# Altium PCB SSB23_rev0.PcbDoc (part 3 of 3)
Units mil, origin at the board's own origin, x right, y up, seen from the top; angles counter-clockwise.
Board outline 4555 x 3775 mil, 2 copper layers (Top Layer, Bottom Layer); 91 components, 73 nets, 352 pads, 879 vias.
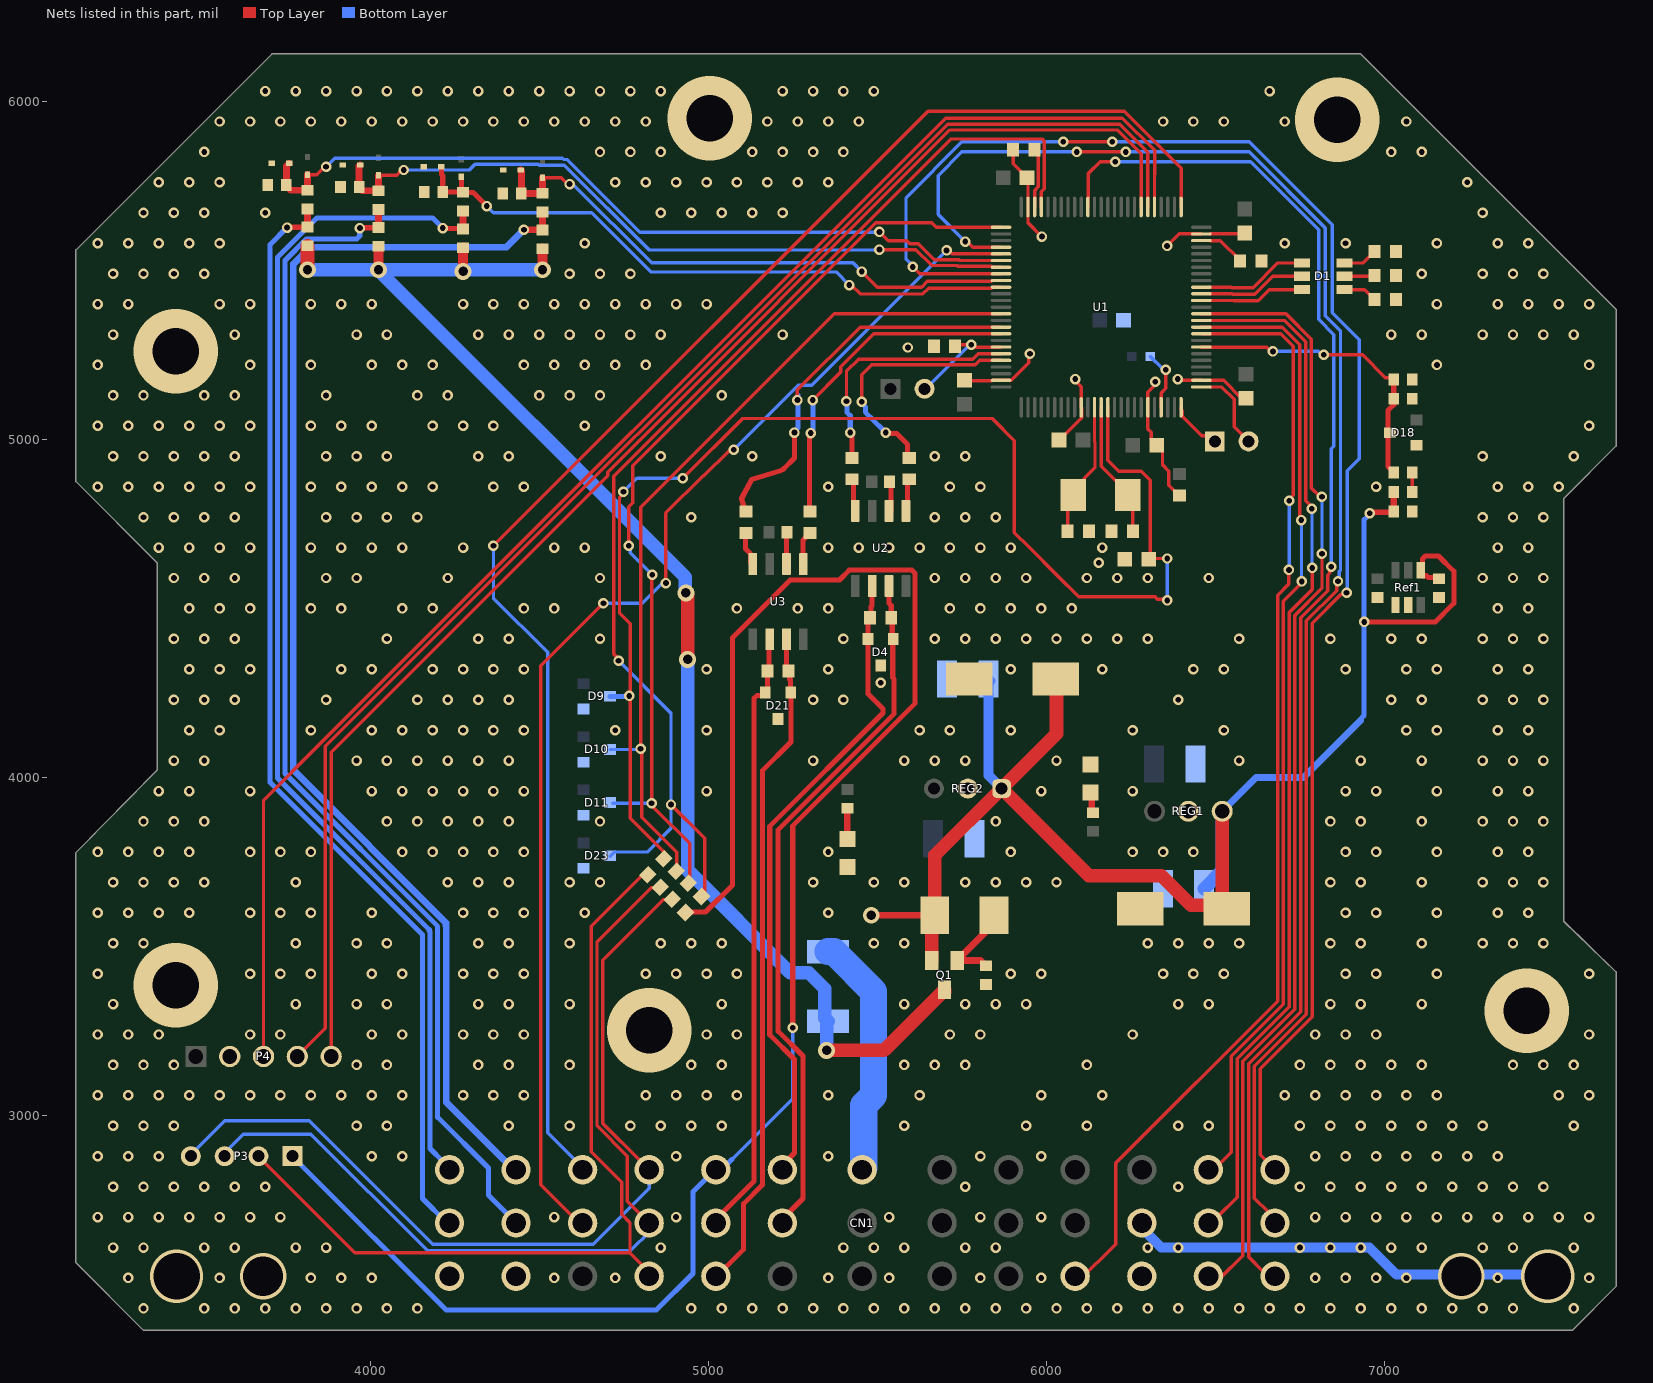
[diagram p2: the nets of this part, all layers, seen from the top]

## Via types
v1: diameter 31, hole 17, Top Layer to Bottom Layer, 854 vias
v2: diameter 50, hole 28, Top Layer to Bottom Layer, 12 vias
v3: diameter 250, hole 137, Top Layer to Bottom Layer, 7 vias
v4: diameter 157.48, hole 137.8, Top Layer to Bottom Layer, 2 vias
v5: diameter 137.8, hole 118.11, Top Layer to Bottom Layer, 2 vias
v6: diameter 59.06, hole 39.37, Top Layer to Bottom Layer, 2 vias

## Nets (pads, with @x,y where several pads share a name; then routed paths per layer and width w, separated by ;. In a path a pad name is that pad's centre, name@x,y a point inside that pad or via, vN(x,y) a via of type N, cw(c..) or ccw(c..) an arc to the next point about the centre after c; other vN are vias at no path point) (continued)
ADC123_IN15: CN1.12 U1.34 | length 3306.2
  Top Layer w10: CN1.12@6095,2510 6205,2620 6205,2860 6684,3339 6684,4539 6717.23,4572.23 v1(6717.23,4613.74) ; U1.34@6460.5,5312 6693,5312 6730,5275 6730,4834.86 v1@6718.5,4823.37
  Bottom Layer w10: v1@6717.87,4614.38 v1@6717.87,4817.87
  other v1: 6718.5,4818.5
BOOT0: P1.2 R4.1 U1.94 | length 348.9
  Top Layer w10: P1.2@5639.76,5149.61 P1.2@5653.57,5163.42 ; R4.1@5730.31,5275.59 5734.25,5279.53 v1(5777.56,5279.53) ; v1@5777.56,5271.65 5783.4,5271.65 5784.62,5272.87 U1.94@5865.98,5272.87
  Bottom Layer w10: P1.2@5639.76,5149.61 5643.7,5149.61 5773.62,5279.53 v1(5777.56,5279.53)
"CAN Rx": R9.2 U1.95 | length 734.5
  Top Layer w10: v1(5408.86,5112.79) 5408.86,5201.22 5445.08,5237.44 5782.27,5237.44 5798.02,5253.19 U1.95@5865.98,5253.19
  Top Layer w15: R9.2@5425,4945 v1@5425,5015
  Bottom Layer w15: v1(5408.86,5112.79) 5410,5111.64 5410,5080 5420,5070 v1(5420,5020)
"CAN Tx": R10.2 U1.96 | length 751.7
  Top Layer w10: v1(5453.86,5111.22) 5453.86,5191.22 5483.08,5220.44 5789.31,5220.44 5802.38,5233.5 U1.96@5865.98,5233.5
  Top Layer w15: v1(5525,5020) 5528.06,5016.94 5558.06,5016.94 5590,4985 5590,4949.63 R10.2@5594.63,4945
  Bottom Layer w15: v1(5453.86,5111.22) 5453.86,5106.89 5464.69,5096.06 5464.69,5080.31 5480.83,5064.17 v1(5525,5020)
CAN_N: CN1.22 D4.2 R11.1 U2.6 | length 1933.6
  Top Layer w15: CN1.22@5219.25,2840 5219.25,2853.85 5255,2889.59 5255,3165.98 5182,3238.98 5182,3855.59 5516.99,4190.58 5516.99,4203.01 5472.41,4247.59 D4.2@5472.41,4409.4 5472.41,4466.65 R11.1@5478.32,4472.56 5481.95,4476.19 5481.95,4505.96 5484.81,4508.82 U2.6@5484.81,4566.23
CAN_P: CN1.23 D4.1 R11.2 U2.7 | length 2061.7
  Top Layer w15: CN1.23@5230,2705 5280,2755 5280,3176.33 5207,3249.33 5207,3845.23 5550,4188.23 5550,4291.62 5545.82,4295.8 5545.82,4408.01 D4.1@5547.21,4409.4 5544.26,4412.35 5544.26,4469.61 R11.2@5541.31,4472.56 5541.31,4508.69 5534.81,4515.19 U2.7@5534.81,4566.23
"Debug LED B": D1.6 U1.39 | length 286.3
  Top Layer w10: U1.39@6484.01,5410.67 6554.35,5410.67 6555.57,5409.45 6625.98,5409.45 6659.45,5442.91 D1.6@6755.91,5442.91
"Debug LED G": D1.5 U1.40 | length 294.4
  Top Layer w10: U1.40@6484.01,5430.35 6549.27,5430.35 6550.49,5429.13 6615.82,5429.13 6668.97,5482.28 D1.5@6755.91,5482.28
"Debug LED R": D1.4 U1.41 | length 302.6
  Top Layer w10: U1.41@6484.01,5450.04 6547.09,5450.04 6548.31,5448.82 6611.46,5448.82 6684.29,5521.65 D1.4@6755.91,5521.65
FL_WHEEL_S_µC: C44.2 D31.2 D32.1 R79.2 U1.85 | length 1900.4
  Top Layer w10: v1(5417.38,5456.22) 5423.06,5456.22 5449.28,5430 5634.9,5430 5652.17,5447.28 5837.79,5447.28 5840.55,5450.04 U1.85@5865.98,5450.04
  Top Layer w15: D32.1@4210.98,5806.56 4210.98,5784.02 4215,5780 C44.2@4215,5731.56 R79.2@4273.97,5731.56 ; R79.2@4270,5735.53 D31.2@4270,5776.56 ; R79.2@4275,5730.53 4304.47,5730.53 v1(4345,5690)
  Bottom Layer w10: v1(4345,5690) 4365,5670 4655,5670 4830,5495 5378.52,5495 5417.3,5456.22 v1(5417.38,5456.22)
FR_WHEEL_S_µC: C43.2 D29.2 D30.1 R77.2 U1.84 | length 1667.7
  Top Layer w10: D29.2@4510,5773.59 4565.72,5773.59 4584.32,5755 v1(4590,5755) ; v1(5453.86,5496.22) 5500.08,5450 5630.86,5450 5647.9,5467.04 5837.86,5467.04 5840.55,5469.72 U1.84@5865.98,5469.72
  Top Layer w20: D30.1@4445.98,5796.56 4447.56,5794.99 C43.2@4447.56,5726.56 4448.06,5727.06 4509.5,5727.06 R77.2@4510,5727.56 D29.2@4510,5773.59
  Bottom Layer w10: v1@4600,5755 4833.18,5521.82 5428.18,5521.82 5453.78,5496.22 v1(5453.86,5496.22)
"GLV Power In": CN1.19 F8.1 | length 717.9
  Bottom Layer w80: F8.1@5354.33,3484.84 F8.1@5371.38,3484.84 ; F8.1@5376.34,3479.88 5489.48,3366.74 5489.48,3060.22 5460,3030.75 5460,2846.32 5455.47,2841.79 CN1.19@5455.47,2840
GND: C1.1 C2.1 C3.1 C4.1 C5.1 C6.1 C7.1 C8.1 C9.1 C10.1 C11.1 C12.2 C13.1 C14.1 C15.1 C16.2 C17.1 C18.1 C19.1 C22.1 C23.1 C24.1 C25.1 C33.1 C41.1 C42.1 C43.1 C44.1 CN1.8 CN1.9 CN1.36 CN1.39 D4.3 D9.1 D10.1 D11.1 D18.1 D21.3 D23.1 D26.2 D28.2 D30.2 D32.2 DS1.2 DS2.2 P4.2 R1.2 R2.2 R3.2 R4.2 R5.1 R45.1 R46.1 Ref1.1 Ref1.2 REG1.2 REG2.2 U1.10 U1.20 U1.27 U1.49 U1.74 U1.99 U2.2 U3.2 | length 3013.1
  Top Layer w10: C9.1@5757.87,5175.2 5759.84,5173.23 5839.33,5173.23 5840.55,5174.45 U1.99@5865.98,5174.45 ; U1.99@5866.06,5174.53 5895.9,5174.53 5947.6,5226.23 5947.6,5249.17 v1(5951.61,5253.19) ; C2.1@5901.57,5856.63 5901.57,5815.13 C25.1@5942.91,5773.79 5946.85,5769.85 5945.71,5768.71 5945.71,5640.98 v1(5987.05,5599.65) ; C6.1@6037.4,4998.03 6038.69,4998.03 6104.25,5063.59 U1.10@6104.25,5093.43 ; v1(6085.47,5178.39) 6085.47,5172.7 6103.19,5154.99 U1.10@6103.19,5094.72 ; v1(6321.69,5170.51) 6321.69,5160.89 6300.12,5139.32 U1.20@6300.12,5094.8 ; v1(6357.12,5572.09) 6392.56,5607.52 U1.49@6458.5,5607.52 ; v1(6388.62,5178.39) 6392.48,5174.53 6458.42,5174.53 U1.27@6458.5,5174.45 ; C3.1@6393.7,4834.65 6391.73,4834.65 6362.02,4864.36 6362.02,4905.7 6343.43,4924.29 6343.43,4965.63 C7.1@6326.77,4982.28 6310.12,4998.94 6310.12,5020.59 6300.04,5030.67 U1.20@6300.04,5094.72 ; U1.27@6484.01,5174.45 6524.37,5174.45 6576.77,5122.05 C8.1@6590.55,5122.05 ; U1.49@6484.01,5607.52 6581.29,5607.52 6582.51,5606.3 C23.1@6586.61,5610.4 ; U1.20@6300.04,5094.72 U1.20@6300.12,5094.8 ; U1.20@6300.04,5094.72 U1.20@6300.12,5094.8
  Top Layer w15: U3.2@5230.34,4630.31 5231.92,4631.88 C24.1@5231.92,4723.98 ; U2.2@5540,4785.78 C19.1@5540,4870
  Bottom Layer w30: CN1.8@6282.24,2682.52 6282.24,2667.51 6339.76,2610 6955,2610 7035,2530 v5@7227.13,2530 ; v5(7227.13,2525.04) 7232.09,2530 v4@7488.09,2530
  other v1: 3330,2430 3510,2430 3600,2430 3690,2430 3780,2430 3870,2430 3960,2430 4050,2430 4140,2430 4950,2430 5040,2430 5130,2430 5220,2430 5310,2430 5400,2430 5490,2430 5580,2430 5670,2430 5760,2430 5850,2430 5940,2430 6030,2430 6120,2430 6210,2430 6300,2430 6390,2430 6480,2430 6570,2430 6660,2430 6750,2430 6840,2430 6930,2430 7020,2430 7110,2430 7200,2430 7290,2430 7380,2430 7560,2430 3285,2520 3555,2520 3825,2520 3915,2520 4005,2520 4545,2520 4725,2520 5355,2520 5535,2520 5805,2520 5985,2520 6795,2520 6885,2520 6975,2520 7065,2520 7335,2520 7605,2520 3240,2610 3330,2610 3510,2610 3600,2610 3780,2610 3870,2610 4860,2610 5400,2610 5490,2610 5580,2610 5760,2610 5850,2610 6300,2610 6390,2610 6750,2610 6840,2610 6930,2610 7020,2610 7110,2610 7290,2610 7380,2610 7560,2610 3195,2700 3285,2700 3375,2700 3465,2700 3555,2700 3645,2700 3735,2700 4545,2700 4905,2700 5535,2700 5805,2700 5985,2700 6795,2700 6885,2700 6975,2700 7065,2700 7155,2700 7245,2700 7335,2700 7425,2700 7515,2700 7605,2700 3240,2790 3330,2790 3420,2790 3510,2790 3600,2790 3690,2790 5760,2790 6390,2790 6750,2790 6840,2790 6930,2790 7020,2790 7110,2790 7200,2790 7290,2790 7380,2790 7470,2790 3195,2880 3285,2880 3375,2880 4005,2880 4095,2880 4905,2880 5355,2880 5805,2880 5985,2880 6795,2880 6885,2880 6975,2880 7065,2880 7155,2880 7245,2880 7335,2880 3240,2970 3330,2970 3420,2970 3960,2970 4050,2970 4410,2970 4590,2970 4770,2970 4860,2970 4950,2970 5040,2970 5580,2970 5940,2970 6120,2970 6390,2970 6480,2970 6750,2970 6840,2970 6930,2970 7020,2970 7110,2970 7200,2970 7290,2970 7560,2970 3195,3060 3285,3060 3375,3060 3465,3060 3555,3060 3645,3060 3735,3060 3825,3060 3915,3060 4005,3060 4095,3060 4275,3060 4365,3060 4455,3060 4815,3060 4905,3060 4995,3060 5085,3060 5355,3060 5625,3060 5985,3060 6165,3060 6705,3060 6795,3060 6885,3060 6975,3060 7065,3060 7155,3060 7515,3060 7605,3060 3240,3150 3330,3150 3420,3150 3960,3150 4050,3150 4320,3150 4410,3150 4590,3150 4950,3150 5040,3150 5580,3150 5670,3150 5760,3150 6120,3150 6750,3150 6840,3150 6930,3150 7020,3150 7110,3150 7380,3150 7470,3150 7560,3150 3195,3240 3285,3240 3375,3240 3645,3240 3735,3240 4005,3240 4095,3240 4275,3240 4365,3240 4455,3240 4995,3240 5085,3240 5715,3240 5805,3240 6255,3240 6795,3240 6885,3240 6975,3240 7605,3240 3240,3330 3780,3330 3960,3330 4050,3330 4320,3330 4410,3330 4590,3330 5040,3330 5580,3330 5760,3330 5850,3330 5940,3330 6390,3330 6480,3330 6840,3330 6930,3330 7110,3330 3195,3420 3645,3420 3735,3420 3825,3420 4005,3420 4095,3420 4275,3420 4365,3420 4455,3420 4815,3420 4905,3420 4995,3420 5085,3420 5895,3420 5985,3420 6345,3420 6435,3420 6525,3420 6885,3420 6975,3420 7155,3420 7605,3420 3240,3510 3330,3510 3780,3510 3960,3510 4050,3510 4320,3510 4410,3510 4590,3510 4860,3510 4950,3510 5040,3510 5490,3510 5580,3510 6300,3510 6390,3510 6480,3510 6570,3510 6840,3510 6930,3510 7110,3510 7290,3510 7380,3510 7470,3510 3195,3600 3285,3600 3375,3600 3465,3600 3645,3600 3735,3600 3825,3600 4005,3600 4275,3600 4365,3600 4455,3600 4635,3600 5355,3600 6885,3600 6975,3600 7155,3600 7335,3600 7425,3600 3240,3690 3330,3690 3420,3690 3510,3690 3780,3690 4230,3690 4320,3690 4410,3690 4590,3690 4680,3690 5310,3690 5490,3690 5580,3690 5760,3690 5850,3690 5940,3690 6030,3690 6840,3690 6930,3690 7110,3690 7290,3690 7380,3690 7470,3690 3195,3780 3285,3780 3375,3780 3465,3780 3645,3780 3735,3780 3825,3780 4095,3780 4185,3780 4275,3780 4365,3780 4455,3780 5355,3780 5895,3780 6255,3780 6345,3780 6435,3780 6885,3780 6975,3780 7155,3780 7335,3780 7425,3780 3330,3870 3420,3870 3510,3870 4050,3870 4140,3870 4230,3870 4320,3870 4410,3870 4680,3870 5850,3870 6840,3870 6930,3870 7110,3870 7290,3870 7380,3870 7470,3870 3375,3960 3465,3960 3645,3960 4005,3960 4095,3960 4185,3960 4275,3960 4365,3960 4455,3960 4995,3960 5985,3960 6255,3960 6885,3960 6975,3960 7155,3960 7335,3960 7425,3960 3420,4050 3510,4050 3960,4050 4050,4050 4140,4050 4230,4050 4320,4050 4410,4050 5310,4050 5580,4050 5670,4050 5760,4050 6030,4050 6570,4050 6930,4050 7110,4050 7290,4050 7380,4050 7470,4050 3465,4140 3555,4140 3825,4140 4005,4140 4095,4140 4185,4140 4275,4140 4365,4140 4455,4140 4725,4140 4995,4140 5625,4140 5715,4140 5895,4140 6255,4140 6525,4140 7065,4140 7155,4140 7335,4140 7425,4140 3420,4230 3510,4230 3600,4230 3870,4230 4140,4230 4230,4230 4320,4230 4410,4230 5310,4230 5400,4230 6390,4230 7020,4230 7110,4230 7290,4230 7380,4230 7470,4230 5510,4280 3465,4320 3555,4320 3645,4320 3915,4320 4005,4320 4185,4320 4275,4320 4365,4320 4455,4320 4995,4320 5355,4320 5895,4320 6165,4320 6435,4320 6525,4320 6885,4320 7065,4320 7155,4320 7335,4320 7425,4320 3420,4410 3510,4410 3600,4410 4050,4410 4320,4410 4410,4410 4680,4410 5400,4410 5670,4410 5760,4410 5850,4410 5940,4410 6030,4410 6120,4410 6210,4410 6300,4410 6570,4410 6840,4410 7020,4410 7110,4410 7290,4410 7380,4410 7470,4410 3465,4500 3555,4500 3645,4500 3825,4500 3915,4500 4095,4500 4185,4500 4455,4500 4545,4500 5085,4500 5265,4500 5355,4500 5715,4500 5805,4500 5895,4500 5985,4500 6075,4500 7335,4500 7425,4500 3420,4590 3510,4590 3600,4590 3870,4590 3960,4590 4230,4590 4680,4590 5670,4590 5760,4590 5850,4590 5940,4590 6120,4590 6210,4590 6300,4590 6480,4590 7290,4590 7380,4590 7470,4590 6155,4635 3375,4680 3465,4680 3555,4680 3645,4680 3825,4680 3915,4680 4005,4680 4095,4680 4275,4680 4545,4680 4635,4680 5355,4680 5445,4680 5535,4680 5625,4680 5715,4680 5805,4680 5895,4680 6165,4680 7335,4680 7425,4680 3330,4770 3420,4770 3510,4770 3600,4770 3870,4770 3960,4770 4050,4770 4140,4770 4950,4770 5670,4770 5760,4770 5850,4770 7290,4770 7380,4770 7470,4770 3195,4860 3285,4860 3375,4860 3465,4860 3555,4860 3645,4860 3825,4860 3915,4860 4005,4860 4095,4860 4185,4860 4365,4860 4455,4860 5355,4860 5715,4860 5805,4860 6975,4860 7335,4860 7425,4860 7515,4860 3240,4950 3330,4950 3420,4950 3510,4950 3600,4950 3870,4950 3960,4950 4050,4950 4320,4950 4410,4950 4860,4950 5130,4950 5670,4950 5760,4950 7290,4950 7560,4950 3195,5040 3285,5040 3375,5040 3465,5040 3555,5040 3645,5040 3825,5040 3915,5040 4005,5040 4185,5040 4275,5040 4365,5040 4635,5040 7605,5040 3240,5130 3330,5130 3510,5130 3600,5130 3870,5130 4140,5130 4230,5130 4500,5130 4590,5130 4680,5130 5040,5130 3195,5220 3645,5220 3825,5220 4005,5220 4095,5220 4185,5220 4455,5220 4545,5220 4635,5220 4725,5220 4815,5220 7155,5220 7605,5220 5590.55,5271.65 3240,5310 3600,5310 3960,5310 4050,5310 4320,5310 4410,5310 4500,5310 4590,5310 4680,5310 4770,5310 4860,5310 5220,5310 7020,5310 7110,5310 7290,5310 7380,5310 7470,5310 7560,5310 3195,5400 3285,5400 3555,5400 3645,5400 3825,5400 3915,5400 4005,5400 4275,5400 4365,5400 4455,5400 4545,5400 4635,5400 4725,5400 4815,5400 4905,5400 4995,5400 7155,5400 7335,5400 7425,5400 7515,5400 7605,5400 3240,5490 3330,5490 3420,5490 3510,5490 4590,5490 4680,5490 4770,5490 7110,5490 7290,5490 7380,5490 7470,5490 3195,5580 3285,5580 3375,5580 3465,5580 3555,5580 4635,5580 6705,5580 6885,5580 7155,5580 7335,5580 7425,5580 3330,5670 3420,5670 3510,5670 3690,5670 4860,5670 4950,5670 5040,5670 5130,5670 5220,5670 7290,5670 3375,5760 3465,5760 3555,5760 4725,5760 4815,5760 4905,5760 4995,5760 5085,5760 5175,5760 5265,5760 5355,5760 7245,5760 3510,5850 4680,5850 4770,5850 4860,5850 5130,5850 5220,5850 5310,5850 5400,5850 7020,5850 7110,5850 3555,5940 3645,5940 3735,5940 3825,5940 3915,5940 4005,5940 4095,5940 4185,5940 4275,5940 4365,5940 4455,5940 4545,5940 4635,5940 4725,5940 4815,5940 5175,5940 5265,5940 5355,5940 5445,5940 6345,5940 6435,5940 6525,5940 6705,5940 7065,5940 3690,6030 3780,6030 3870,6030 3960,6030 4050,6030 4140,6030 4230,6030 4320,6030 4410,6030 4500,6030 4590,6030 4680,6030 4770,6030 4860,6030 5220,6030 5310,6030 5400,6030 5490,6030 6660,6030
  other v3: 4825.2,3252.83 7420,3310 3425.2,3385.83 3425.2,5260.87 6860,5945 5005,5950
  other v4: 3427.91,2525.04 7483.03,2525.04
  other v5: 3683.82,2525.04
I2C2_SDA: CN1.32 U1.80 | length 3693.3
  Top Layer w10: CN1.32@4610,2690 4505,2795 4505,4330 v1(4690,4515) ; v1(4875,4575) 4875,4782.33 4984.67,4892 4987,4892 5060.28,4965.28 5071.68,4965.28 v1(5075.7,4969.3) ; v1(5705,5558.72) 5710.68,5558.72 5720.94,5548.46 U1.80@5865.98,5548.46
  Bottom Layer w10: v1(4690,4515) 4805,4515 4875,4585 v1(4875,4575) ; v1(5075.7,4969.3) 5266.4,5160 5306.28,5160 v1(5705,5558.72)
I2C2_SMBA: CN1.31 U1.51 | length 4664.2
  Top Layer w10: v1(4365,4685) 5650,5970 6230,5970 6398.46,5801.54 U1.51@6398.46,5687.24
  Bottom Layer w10: v1(4365,4685) 4365,4530 4525,4370 4525,3325 4525,2950 CN1.31@4605,2870
"LORA Reset": P4.5 U1.57 | length 4250.9
  Top Layer w10: P4.5@3885,3174.04 3885,4075 4703,4893 4703,4903 5715,5915 6210,5915 6280.35,5844.65 U1.57@6280.35,5687.24
NetCN1_1: CN1.1 U1.83 | length 4886.8
  Top Layer w10: v1(5605,5510) 5625.59,5489.41 U1.83@5865.98,5489.41 ; v1(6050,5880) v1(6195,5880) ; CN1.1@6675.94,2840 6632,2883.94 6632,3138.94 6786,3292.94 6786,4456 6872.68,4542.68 6883.77,4542.68 v1(6887.79,4546.69)
  Bottom Layer w10: v1(5605,5510) 5605,5513.13 5585,5533.13 5585,5715 5750,5880 v1(6050,5880) ; v1(6195,5880) 6600,5880 6845,5635 6845,5375 6925,5295 6925,4942.29 6890,4907.29 6890,4548.91 v1(6887.79,4546.69)
NetCN1_2: CN1.2 U1.79 | length 4662.9
  Top Layer w10: v1(5760,5585) 5765.68,5585 5782.53,5568.15 U1.79@5865.98,5568.15 ; v1(6090,5850) v1(6235,5850) ; CN1.2@6657.06,2712.06 6657.06,2713.69 6615,2755.75 6615,3145.98 6769,3299.98 6769,4463.04 6858.48,4552.52 6858.48,4576.2 v1(6862.5,4580.21)
  Bottom Layer w10: v1(5760,5585) 5680,5665 5680,5780 5750,5850 v1(6090,5850) ; v1(6235,5850) 6600,5850 6825,5625 6825,5365 6870,5320 6870,4613.4 6866.52,4609.91 6866.52,4584.23 v1(6862.5,4580.21)
NetCN1_3: CN1.3 U1.65 | length 4098.8
  Top Layer w10: U1.65@6122.87,5687.24 6122.87,5712.68 6123.86,5713.66 6123.86,5786.22 6158.86,5821.22 v1(6203.86,5821.22) ; CN1.3@6640,2540 6598,2582 6598,3153.02 6600,3155.02 6741.04,3296.06 6752,3307.02 6752,4472 6832,4552 6832,4598.39 6838.48,4604.87 6838.48,4619.29 v1(6842.5,4623.31)
  Bottom Layer w10: v1(6203.86,5821.22) 6603.78,5821.22 6805,5620 6805,5355 6850,5310 6850,4979.3 6842.5,4971.8 v1(6842.5,4623.31)
NetCN1_4: CN1.4 U1.35 | length 2878.7
  Top Layer w10: U1.35@6458.5,5331.93 6458.57,5332 6698,5332 6749.86,5280.14 6749.86,4765.22 v1(6753.86,4761.22) ; CN1.4@6479.09,2840 6495,2840 6547,2892 6547,3175.08 6701,3329.08 6701,4521.4 6755,4575.4 v1(6755,4580)
  Bottom Layer w10: v1(6753.86,4761.22) 6754.43,4760.65 6754.43,4580.57 v1(6755,4580)
NetCN1_5: CN1.5 U1.36 | length 3049.7
  Top Layer w10: U1.36@6458.5,5351.61 6703.39,5351.61 6766.86,5288.14 6766.86,4818.83 6785,4800.68 v1(6785,4795) ; CN1.5@6503.15,2698.15 6564,2759 6564,3168.04 6718,3322.04 6718,4488 6785.98,4555.98 v1(6785.98,4619.7)
  Bottom Layer w10: v1(6785,4795) 6785.49,4794.51 6785.49,4620.19 v1(6785.98,4619.7)
NetCN1_6: CN1.6 U1.37 | length 3281.1
  Top Layer w10: U1.37@6458.5,5371.3 6708.7,5371.3 6783.86,5296.14 6783.86,4856.14 6810,4830 v1(6815,4830) ; CN1.6@6479.09,2525.04 CN1.6@6485,2530.95 ; CN1.6@6515,2520 6581,2586 6581,3161 6735,3315 6735,4479.04 6815,4559.04 v1(6815,4662.01)
  Bottom Layer w10: v1(6815,4662.01) v1(6815,4830)
NetD1_1: D1.1 R3.1 | length 100.8
  Top Layer w10: D1.1@6881.89,5442.91 6940.94,5442.91 R3.1@6970.47,5413.39
NetD1_2: D1.2 R2.1 | length 89.5
  Top Layer w10: D1.2@6881.89,5482.28 6968.34,5482.28 R2.1@6970.47,5484.42
NetD1_3: D1.3 R1.1 | length 102.6
  Top Layer w10: D1.3@6881.89,5521.65 6936.67,5521.65 R1.1@6970.47,5555.45
NetD2_A: D2.A Q1.1 R5.2 | length 270.4
  Top Layer w20: R5.2@5821.03,3442.91 5805.29,3458.66 Q1.1@5736.22,3458.66 5845.47,3567.91 D2.A@5845.47,3592.52
NetDS1_1: DS1.1 R6.2 | length 63.5
  Top Layer w20: DS1.1@6129.92,3955.88 6133.94,3951.86 6133.94,3899.69 R6.2@6137.96,3895.67
NetDS2_1: DS2.1 R7.2 | length 91.9
  Top Layer w20: DS2.1@5411.42,3817.55 R7.2@5411.42,3909.45
NetL1_2: L1.2 U1.22 | length 188.9
  Top Layer w10: U1.22@6339.41,5094.72 6339.41,5137.05 6353.19,5150.83 v1(6353.19,5205.94)
  Bottom Layer w10: L1.2@6307.56,5245 v1@6343.55,5209.01 ; v1@6347.16,5198.26 6353.19,5204.29 v1(6353.19,5205.94)
  Bottom Layer w15: v1@6343.55,5209.01 6350.13,5209.01 v1(6353.19,5205.94)
NetR9_1: R9.1 U2.4 | length 83.5
  Top Layer w15: U2.4@5430,4791.48 R9.1@5430,4875
NetR10_1: R10.1 U2.1 | length 83.5
  Top Layer w15: U2.1@5590,4786.48 R10.1@5590,4870
NetR28_1: R28.1 U3.4 | length 101.2
  Top Layer w15: R28.1@5110,4723.03 5110,4676.49 5125.05,4661.44 5125.05,4635.6 U3.4@5130.34,4630.31
NetR29_1: R29.1 U3.1 | length 81.4
  Top Layer w15: U3.1@5280,4650 5280,4702.01 5287.81,4709.82 5287.81,4711.79 5298.03,4722.01 R29.1@5300,4722.01
NetR43_2: R43.2 R44.1 | length 57.3
  Top Layer w10: R43.2@7082.56,4844.47 R44.1@7082.56,4901.72
NRST: C1.2 D9.3 F5.1 U1.14 | length 4002
  Top Layer w10: v1(4749.32,4845) 4749.32,4839.32 4737.5,4827.5 4737.5,4487.5 4770,4455 v1@4770,4241.25 ; v1@4766.31,4233.69 4767.43,4233.69 4769.57,4231.55 4769.57,3879.48 4870.1,3778.95 4870.1,3760.97 F5.1@4868.71,3759.57 ; v1(4925,4885) 5101.64,5061.64 5839.93,5061.64 5905.51,4996.06 5905.51,4724.41 5949.11,4680.81 6031.51,4598.41 6095.8,4534.12 6321.79,4534.12 6328.27,4527.64 6353.27,4527.64 v1(6357.29,4523.62) ; U1.14@6181.93,5094.72 6181.93,4938.15 6214.05,4906.03 6280.23,4906.03 6307.09,4879.18 6307.09,4649.44 C1.2@6305.29,4647.64 ; C1.2@6303.15,4645.5 C1.2@6305.29,4647.64 ; v1(6357.29,4647.64) C1.2@6305.29,4647.64
  Top Layer w15: v1@4766.31,4233.69 v1(4766.31,4241.25)
  Bottom Layer w10: v1(4749.32,4845) 4789.32,4885 v1(4925,4885) ; v1(6357.29,4523.62) v1(6357.29,4647.64)
  Bottom Layer w15: D9.3@4710,4240 4765.06,4240 v1(4766.31,4241.25)
"NRST F": CN1.30 F5.2 P3.2 | length 2545.6
  Top Layer w10: P3.2@3670,2880 3955,2595 4768.66,2595 ; CN1.30@4807.06,2555.87 4807.06,2556.6 4768.66,2595 ; CN1.30@4808.09,2556.91 CN1.30@4830,2535 ; F5.2@4821.38,3712.25 4806.13,3712.25 4654.2,3560.31 4654.2,2892.72 4743.98,2802.93 4743.98,2708.73 4768.66,2684.05 4768.66,2595
"Ph0 OSC In": C4.2 U1.12 X1.1 | length 400.4
  Top Layer w10: C4.2@6062.82,4728.35 6062.82,4826.6 6082.68,4846.46 6082.68,4854.33 6143.7,4915.35 6143.7,4991.75 6142.56,4992.89 U1.12@6142.56,5094.72
"Ph1 OSC Out": C10.2 U1.13 X1.2 | length 405.2
  Top Layer w10: U1.13@6162.24,5094.72 6162.24,4920.43 6236.22,4846.46 6255.91,4826.77 C10.2@6255.91,4728.35
RL_WHEEL_S_µC: C42.2 D27.2 D28.1 R75.2 U1.82 | length 2157.8
  Top Layer w10: D27.2@4025,5781.03 4078.79,5781.03 4094.32,5796.56 v1(4100,5796.56) ; v1(5506.36,5561.22) 5613.78,5561.22 5660.78,5514.22 5734.89,5514.22 5737.34,5511.78 5837.86,5511.78 5840.55,5509.09 U1.82@5865.98,5509.09
  Top Layer w20: D28.1@3970.98,5811.56 3967.56,5808.14 C42.2@3967.56,5746.56 3967.56,5744.6 3977.16,5735 R75.2@4025,5735 D27.2@4025,5781.03
  Bottom Layer w10: v1(4100,5796.56) 4292.84,5796.56 4310.34,5814.06 4497.5,5814.06 4500.86,5810.71 4574.29,5810.71 4825,5560 5505.14,5560 v1(5506.36,5561.22)
RR_WHEEL_S_µC: C41.2 D25.2 D26.1 R73.2 U1.81 | length 2381.9
  Top Layer w10: D25.2@3815,5783.02 3842.84,5783.02 3865.88,5806.06 v1(3870,5806.06) ; v1(5506.36,5613.28) 5531.8,5587.83 5587.17,5587.83 5596.78,5578.22 5620.82,5578.22 5667.82,5531.22 5741.94,5531.22 5744.38,5528.78 U1.81@5865.98,5528.78
  Top Layer w20: D26.1@3760.98,5816.56 3752.56,5808.14 C41.2@3752.56,5751.56 3752.56,5749.6 3765.59,5736.56 R73.2@3815,5736.56 D25.2@3815,5783.02
  Bottom Layer w10: v1(3870,5806.06) 3895,5831.06 4568.94,5831.06 4572.29,5827.71 4581.33,5827.71 4796.98,5612.06 5505.14,5612.06 v1(5506.36,5613.28)
"Sensor CAN Rx": R28.2 U1.91 | length 1151.3
  Top Layer w10: v1(5263.86,5116.22) 5263.86,5146.22 5449.57,5331.93 U1.91@5865.98,5331.93
  Top Layer w15: R28.2@5110.69,4785 5098.44,4824.91 5128.23,4881.09 5215.87,4907.99 5220.51,4910.78 5223.38,4913.02 5255,4944.64 v1(5255,5020)
  Bottom Layer w15: v1(5255,5020) 5255,5024.33 5265,5034.33 5265,5115.08 v1(5263.86,5116.22) 5265,5117.36 v1@5265,5131.02
"Sensor CAN Tx": R29.2 U1.92 | length 968.8
  Top Layer w10: v1(5308.86,5116.22) 5391.86,5199.22 5391.86,5214.22 5489.88,5312.24 U1.92@5865.98,5312.24
  Top Layer w15: R29.2@5300,4785 5300,5010.67 5303.47,5014.14 v1(5303.47,5018.47)
  Bottom Layer w15: v1(5308.86,5116.22) 5310,5115.08 v1@5310,5029.92
Sensor_CAN_N: CN1.26 D21.2 R30.1 U3.6 | length 1781.7
  Top Layer w15: CN1.26@5030,2700 5135,2805 5135,4233.37 5143.79,4242.16 5160.93,4242.16 5169.17,4250.41 D21.2@5169.17,4252.06 5175.08,4257.96 R30.1@5175.08,4315.22 5179.3,4319.44 5179.3,4406.62 U3.6@5181.57,4408.89
Sensor_CAN_P: CN1.27 D21.1 R30.2 U3.7 | length 1973.8
  Top Layer w15: CN1.27@5022.4,2525.04 5025.04,2525.04 5105,2605 5105,2739.64 5160,2794.64 5160,4020 5245,4105 D21.1@5245,4245 ; U3.7@5231.57,4408.89 5231.57,4323.68 5240.04,4315.22 5240.04,4290.29 ; D21.1@5243.98,4252.26 5243.98,4290.29
"Serial Rx": P2.2 U1.26 | length 228.1
  Top Layer w10: U1.26@6484.01,5154.76 6518.46,5154.76 6555.12,5118.11 6555.12,5037.01 P2.2@6598.03,4994.09
"Serial Tx": P2.1 U1.25 | length 155.5
  Top Layer w10: U1.25@6398.46,5094.72 6398.46,5086.94 6398.54,5086.87 6399.61,5086.87 6402.01,5084.46 6402.01,5067.99 6459.36,5010.64 6481.49,5010.64 P2.1@6498.03,4994.09
"SSB Power": F8.2 Q1.3 R72.2 R74.2 R76.2 R78.2 | length 4288
  Top Layer w30: v2(4025,5501.56) R74.2@4025,5571.45 R74.2@4026.97,5571.45 ; v2(4275,5496.56) R78.2@4275,5566.98 R78.2@4276.97,5566.98 ; v2(4510,5501.56) R76.2@4510,5564.01
  Top Layer w40: v2(3815,5501.56) R72.2@3815,5573.01 ; v2(4934.04,4545.96) 4934.04,4543.25 4938.83,4538.46 v2(4938.83,4349.49) ; v2(5350.39,3192.91) 5519.69,3192.91 5691.26,3364.49 5698.5,3364.49 5698.82,3364.8 Q1.3@5698.82,3372.05
  Bottom Layer w40: v2(3815,5501.56) v2(4025,5501.56) 4275,5501.56 v2(4510,5501.56) ; v2@4027.48,5497.52 4932.13,4592.87 4932.13,4547.87 v2(4934.04,4545.96) ; v2(4938.83,4349.49) 4938.83,3726.17 5242.2,3422.8 5297.2,3422.8 5345,3375 5345,3288.27 F8.2@5354.33,3278.94 5350.39,3275 v2(5350.39,3192.91)
SWDIO: D23.3 F3.1 U1.72 | length 3514.3
  Top Layer w10: v1(4735,4345) 4735,4350.68 4720.5,4365.18 4720.5,4890.35 5718.47,5888.32 5987.25,5888.32 5994.28,5881.29 5994.28,5740.84 5985.16,5731.71 5985.16,5687.32 U1.72@5985.08,5687.24 ; v1(4890,3920) 4990,3820 F3.1@4990,3660
  Bottom Layer w10: D23.3@4710,3766.86 4722.72,3779.58 4819.58,3779.58 4890,3850 v1(4890,3920) 4890,4190 v1(4735,4345)
"SWDIO F": CN1.25 F3.2 P3.1 | length 5265
  Top Layer w15: F3.2@4932.93,3600.71 4934.32,3602.1 4992.1,3602.1 5072.25,3682.25 5072.25,4414.22 5242.38,4584.35 5388.27,4584.35 5417.14,4613.21 5602.49,4613.21 5612.11,4603.59 5612.11,4219.23 5250,3857.12 v1(5250,3260)
  Bottom Layer w10: 5070,2870 5250,3050 v1(5250,3260)
  Bottom Layer w15: P3.1@3770,2880 3792.03,2857.97 4225,2425 4846.63,2425 4955,2533.37 4955,2775 5020,2840 CN1.25@5022.4,2840 ; CN1.25@5055,2855 5070,2870
"UC LORA Rx": P4.3 U1.55 | length 4435.7
  Top Layer w10: P4.3@3685,3175 3685,3933.08 3851,4099.08 5701.92,5950 6225,5950 6320,5855 6320,5783.11 6319.72,5782.83 U1.55@6319.72,5687.24
"UC LORA Tx": P4.4 U1.56 | length 4341.7
  Top Layer w10: P4.4@3785,3175 3868,3258 3868,4092.04 5707.96,5932 6217.04,5932 6300.04,5849 U1.56@6300.04,5687.24
"UC SWCLK": D11.3 F7.1 U1.76 | length 2825.2
  Top Layer w10: v1(4765,4685) 4765,4800.75 4776.82,4812.56 4776.82,4922.63 5494.97,5640.78 5660.93,5640.78 5674.51,5627.2 U1.76@5865.98,5627.2 ; v1(4832.5,3923.75) 4832.5,3918.07 4840.94,3909.63 4840.94,3909.06 4945,3805 4945,3708.34 4941.46,3704.81 F7.1@4941.46,3686.82 ; v1@4833.44,3924.06 4833.44,4598.44 v1(4834.38,4599.38)
  Bottom Layer w10: D11.3@4717.41,3924.46 4718.11,3923.75 v1(4832.5,3923.75) ; v1(4765,4685) 4769.02,4680.98 4769.02,4664.73 v1(4834.38,4599.38)
"UC SWCLK F": CN1.28 F7.2 P3.4 | length 2597.6
  Top Layer w10: CN1.28@4800,2865 4688.2,2976.8 4688.2,3459.67 4866.63,3638.1 4892.74,3638.1 F7.2@4894.14,3639.5
  Bottom Layer w10: P3.4@3470,2880 3470,2885 3570,2985 3820,2985 4185,2620 4660,2620 4825.55,2785.55 CN1.28@4825.55,2840
"UC SWO": D10.3 F6.1 U1.89 | length 2514.9
  Top Layer w10: F6.1@4905.09,3723.2 4905.09,3741.18 4907.16,3743.25 4907.16,3778.95 4803.26,3882.85 4803.26,4081.74 v1(4800,4085) 4800,4798.89 5372.41,5371.3 U1.89@5865.98,5371.3
  Bottom Layer w10: D10.3@4710,4082.94 4797.94,4082.94 v1(4800,4085)
"UC SWO F": CN1.29 F6.2 P3.3 | length 2591.1
  Top Layer w10: CN1.29@4810,2695 4810,2698.07 4760.98,2747.09 4760.98,2879.98 4671.2,2969.76 4671.2,3514.76 4830.91,3674.48 4856.37,3674.48 F6.2@4857.76,3675.87
  Bottom Layer w10: P3.3@3570,2880 3570,2890 3625,2945 3825,2945 4170,2600 4770,2600 CN1.29@4830,2660
"UC Vbatt": C33.2 D18.3 R44.2 R45.2 U1.32 | length 898.6
  Top Layer w10: U1.32@6458.5,5272.87 6651.44,5272.87 6664.32,5260 v1(6670,5260) ; v1(6820,5250) 6935,5250 7002.55,5182.45 7022.3,5182.45 C33.2@7027.44,5177.31
  Top Layer w15: R44.2@7027.44,4901.72 7010,4919.16 7010,5085 7027.44,5102.44 R45.2@7027.44,5120.06 C33.2@7027.44,5177.31
  Bottom Layer w10: v1(6670,5260) 6804.32,5260 6814.32,5250 v1(6820,5250)
Vbatt: C12.1 C13.2 C15.2 C16.1 C17.2 D2.K Q1.2 R43.1 R46.2 Ref1.4 REG1.1 REG2.1 | length 4741.2
  Top Layer w15: v1(6940,4460) 7150,4460 7205,4515 7205,4610 7160,4655 7120.89,4655 7112.11,4646.21 7112.11,4617.85 Ref1.4@7107.4,4613.15 7107.4,4601.34 7112.11,4596.63 7123.92,4596.63 7129.29,4591.26 7155.02,4591.26 C15.2@7161.28,4585 ; v1(6956.53,4781.53) 6959.37,4784.37 7024.6,4784.37 R46.2@7027.44,4787.21
  Top Layer w20: v2(5482.28,3592.52) D2.K@5670.28,3592.52 ; R46.2@7027.44,4787.21 R43.1@7027.44,4844.47
  Top Layer w40: Q1.2@5661.42,3458.66 5661.42,3583.66 D2.K@5670.28,3592.52 5670.28,3769.88 REG2.1@5867.72,3967.32 ; C16.1@6030,4290 6030,4129.61 REG2.1@5867.72,3967.32 ; REG1.1@6520,3900 6520,3625.67 C12.1@6523.67,3622 ; C12.1@6533.46,3612.2 C12.1@6523.67,3622 ; REG2.1@5867.72,3967.32 6125.04,3710 6340,3710 6428,3622 C12.1@6523.67,3622
  Bottom Layer w15: 6930,4170 6930,4174.14 6939.5,4183.64 6939.5,4459.5 v1(6940,4460) 6940,4591.37 6939.8,4591.57 6939.8,4762.63 6956.53,4779.37 v1(6956.53,4781.53)
  Bottom Layer w20: REG1.1@6520,3900 6620,4000 6760,4000 6930,4170
  Bottom Layer w30: C17.2@5828.74,4291.34 5835,4285.08 5835,4285 5828.74,4278.74 5828.74,4006.3 REG2.1@5867.72,3967.32
  Bottom Layer w40: C13.2@6466.54,3671.26 6520.14,3724.86 6520.14,3899.86 REG1.1@6520,3900
Vcap1: C22.2 U1.48 | length 114.9
  Top Layer w10: U1.48@6484.01,5587.83 6514.53,5587.83 6572.83,5529.53 C22.2@6572.83,5527.56
Vcap2: C2.2 U1.73 | length 179
  Top Layer w10: C2.2@5964.57,5856.63 5976.57,5844.63 5976.57,5747.17 5965.39,5735.99 U1.73@5965.39,5687.24
WH_SP_FL_IN: CN1.37 R78.1 R79.1 | length 3539.4
  Top Layer w15: v1(4215,5625) 4216.45,5623.55 4273.55,5623.55 R78.1@4275,5622.1
  Top Layer w20: R78.1@4275,5622.1 R79.1@4275,5675.41
  Bottom Layer w15: CN1.37@4215,2865 4177,2903 4177,3544.11 4175,3546.11 4175,3550 3726.5,3998.5 3726.5,5538.22 3843.28,5655 4185,5655 v1(4215,5625)
WH_SP_FR_IN: CN1.34 R76.1 R77.1 | length 3760.3
  Top Layer w20: v1(4455,5620) 4455.44,5619.56 4509.56,5619.56 R76.1@4510,5619.12 R77.1@4510,5672.44
  Bottom Layer w20: CN1.34@4410,2855 4225,3040 4225,3560 4224.5,3560.5 4224.5,3570.15 3773,4021.65 3773,5518.96 3822.47,5568.43 4403.43,5568.43 v1(4455,5620)
WH_SP_RL_IN: CN1.35 R74.1 R75.1 | length 3474.6
  Top Layer w15: v1(3970,5625) 3970.78,5625.78 4024.22,5625.78 R74.1@4025,5626.56
  Top Layer w20: R74.1@4025,5626.56 R75.1@4025,5679.88
  Bottom Layer w15: v1(3970,5625) 3969.54,5624.54 3969.54,5601.72 3960.76,5592.93 3812.32,5592.93 3748.5,5529.11 3748.5,4011.5 4200,3560 4200,2995 4350,2845 4350,2765 CN1.35@4405,2710
WH_SP_RR_IN: CN1.38 R72.1 R73.1 | length 3292.2
  Top Layer w15: v1(3754.46,5626.3) 3755.38,5627.22 3814.09,5627.22 R72.1@3815,5628.13
  Top Layer w20: R72.1@3815,5628.13 R73.1@3815,5681.45
  Bottom Layer w15: v1(3754.46,5626.3) 3704.5,5576.34 3704.5,3985.5 4155,3535 4155,2755 CN1.38@4225,2685
pads on no net: CN1.14 CN1.17 CN1.18 CN1.21 CN1.33 P1.1 Ref1.3 Ref1.5 U1.1 U1.2 U1.3 U1.4 U1.5 U1.7 U1.8 U1.9 U1.17 U1.18 U1.29 U1.38 U1.42 U1.43 U1.44 U1.45 U1.46 U1.47 U1.52 U1.53 U1.54 U1.58 U1.59 U1.60 U1.61 U1.62 U1.63 U1.64 U1.66 U1.67 U1.68 U1.69 U1.70 U1.71 U1.77 U1.78 U1.86 U1.87 U1.88 U1.90 U1.93 U1.97 U1.98 U2.5 U2.8 U3.5 U3.8
copper on no net:
  other v3: 7420,5100

## Polygon pours and split planes (outlines as drawn)
GND on Top Layer "Top Layer-GND" (solid, shelved, pour order 8): 7685,4980 7530,4825 7530,3582.26 7685,3425 7685,2495 7555,2365 3330,2365 3130,2565 3130,3778.16 3370,4018.16 3370,4635 3130,4875 3130,5560 3710,6140 6930,6140 7685,5385
GND on Bottom Layer "Bottom Layer-GND" (solid, shelved, pour order 10): 3130,4875 3370,4635 3370,4020 3130,3780 3130,2565 3330,2365 7555,2365 7685,2495 7685,3425 7530.52,3585 7530,3585 7530,4825 7685,4980 7685,5385 6930,6140 3710,6140 3130,5560

## Other copper
Top Layer:
  pour cut-out: 5669.29,5826.77 5669.29,5118.11 5984.25,4803.15 6456.69,4803.15 6642.72,4989.17 6642.72,5826.77

## Silkscreen, mask and mechanical layers (free items; w line width, h text height)
Top Overlay:
  drawing of 21 lines, arcs and shapes, not listed
  text "ePBR23_SSB_rev0" at 5185.04,6027.56 h60
  text "WHEEL SPEED" at 3930,5950 h40
  text "LORA MODULE" at 3890,5010 h60
  text "PROGRAMING DONGLE" at 3370,2970 h30
  text "SD CARD" at 6440,2955 h40
  text "CAN" at 5155,2935 h40
  text "WH_SP" at 4250,2921.66 h40
  text "3v3" at 7490,2910 h60
  text "4" at 6465,2895 h30.98
  text "1" at 6675,2895 h30.98
  text "5v" at 7415,2745 h60
  text "ADC" at 5560,2740 h40
Bottom Overlay:
  drawing of 12 lines, arcs and shapes, not listed
Board Outline:
  lines w10: 3333.64,2360 7555,2360 7690,2495 7690,3425 7535,3580 7535,4825 7690,4980 7690,5385 6933.27,6141.73 3715,6141.73 ; 3335,2360 3128.35,2566.65 3128.35,3778.35 3370,4020 3370,4635 3128.35,4876.65 3128.35,5558.35 3711.73,6141.73

## Text inside footprints (layer, text, board x,y; h text height)
P4: Top Overlay "5" at 3870.04,3241.93 h40; Top Overlay "1" at 3545,3245 h40
REG1: Mechanical 1 "*" at 6625,3900 h31.25 r180; Top Overlay "*" at 6675,3900 h31.25 r180